# Altium PCB Orion-Bridge-R4.PcbDoc (part 2 of 2)
Units mil, origin at the board's own origin, x right, y up, seen from the top; angles counter-clockwise.
Board outline 1889.76 x 1259.84 mil, 2 copper layers (Top Layer, Bottom Layer), stack 62.992 mil thick; 52 components, 35 nets, 164 pads, 41 vias.
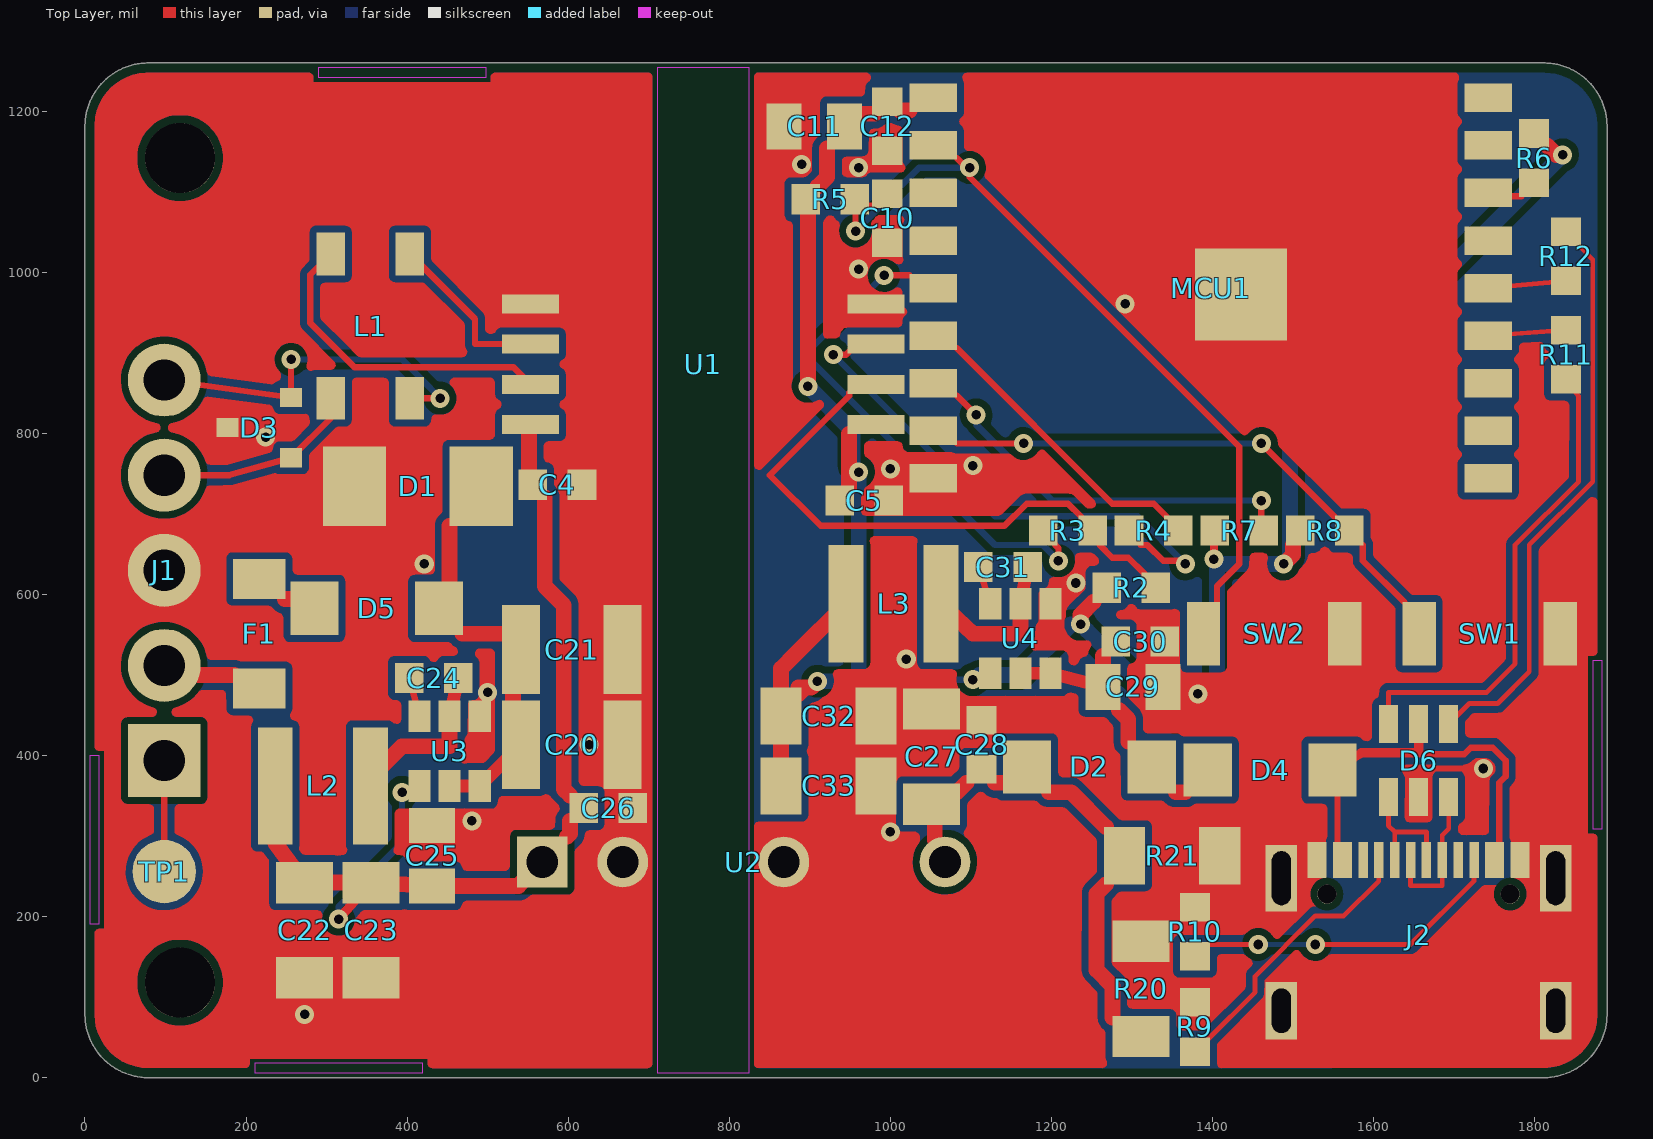
[diagram p0: Top Layer view]

## Via types
v1: diameter 23.62, hole 11.81, Top Layer to Bottom Layer, tented both sides, 41 vias

## Nets (pads, with @x,y where several pads share a name; then routed paths per layer and width w, separated by ;. In a path a pad name is that pad's centre, name@x,y a point inside that pad or via, vN(x,y) a via of type N, cw(c..) or ccw(c..) an arc to the next point about the centre after c; other vN are vias at no path point) (continued)
USB_DP: (continued)
  Top Layer w5.91: D6.4 1718.7,464.57 1753.94,464.57 1793.31,503.94 1793.31,661.42 1872.05,740.16 1872.05,1015.75 R12.1
USB_DP_IN: D6.3 J2.A6 J2.B6 | length 184.8
  Top Layer w5.91: J2.A6 1645.87,238.19 1685.24,238.19 J2.B6 1685.24,301.18 1693.11,309.06 D6.3
USB_DP_MCU: MCU1.14 R12.2 | length 96.9
  Top Layer w5.91: MCU1.14 R12.2
USB_VBUS: D4.2 D6.5 J2.A4_B9 J2.B4_A9 | length 429.3
  Top Layer w7.87: J2.A4_B9@1555.12,291.34 D4.2@1555.12,350.39 ; 1657.48,401.57 1712.6,401.57 1720.47,409.45 1748.03,409.45 1763.78,393.7 1763.78,374.02 1755.91,366.14 J2.B4_A9@1755.91,291.34
  Top Layer w11.81: D4.2 1584.65,403.15 1655.71,403.15 D6.5
pads on no net: J2. J2.A8 J2.B8 MCU1.3 MCU1.4 MCU1.10 MCU1.11 MCU1.12 MCU1.15 MCU1.17 MCU1.18

## Keep-outs
Keep-Out Layer:
  region: 710.63,5.91 824.8,5.91 824.8,1253.94 710.63,1253.94
  region: 5.91,190.94 17.72,190.94 17.72,399.61 5.91,399.61
  region: 210.63,5.91 419.29,5.91 419.29,17.72 210.63,17.72
  region: 289.37,1242.13 498.03,1242.13 498.03,1253.94 289.37,1253.94
  region: 1872.05,309.06 1883.86,309.06 1883.86,517.72 1872.05,517.72

## Other copper
Top Layer:
  drawing of 35 lines, arcs and shapes, not listed
Bottom Layer:
  drawing of 61 lines, arcs and shapes, not listed

## Silkscreen, mask and mechanical layers (free items; w line width, h text height)
Bottom Overlay:
  lines w5.91: 181.1,413.39 200.79,413.39 200.79,393.7 181.1,393.7 181.1,374.02 200.79,374.02 ; 188.98,511.81 208.66,511.81 ; 188.98,629.92 208.66,629.92 ; 188.98,728.35 188.98,767.72 ; 188.98,748.03 208.66,748.03 ; 188.98,846.46 208.66,846.46 208.66,885.83 ; 198.82,492.13 198.82,531.5 ; 208.66,728.35 208.66,767.72 ; 240.16,374.02 259.84,374.02 ; 250,374.02 250,413.39 259.84,403.54 ; 1417.32,661.42 1437.01,661.42 ; 1427.17,622.05 1427.17,661.42 ; 1446.85,622.05 1466.54,622.05 1466.54,661.42 1446.85,661.42 ; 1456.69,641.73 1466.54,641.73 ; 1476.38,661.42 1496.06,661.42 1496.06,641.73 1476.38,641.73 1476.38,622.05 1496.06,622.05 ; 1505.91,622.05 1525.59,622.05 1525.59,661.42 1505.91,661.42 ; 1515.75,641.73 1525.59,641.73 ; 1535.43,622.05 1545.28,641.73 ; 1555.12,622.05 1555.12,661.42 1535.43,661.42 1535.43,641.73 1555.12,641.73 ; 1702.76,661.42 1722.44,661.42 ; 1712.6,622.05 1712.6,661.42 ; 1811.02,641.73 1801.18,641.73 ; 1801.18,641.73 1791.34,651.57 1801.18,661.42 1811.02,661.42 1811.02,622.05 1801.18,622.05 1791.34,631.89 1801.18,641.73 ; 1732.28,622.05 1732.28,661.42 1751.97,661.42 1751.97,622.05 1732.28,622.05 ; 1761.81,622.05 1761.81,661.42 1781.5,661.42 1781.5,622.05 1761.81,622.05
Board outline:
  drawing of 260 lines, arcs and shapes, not listed
Isolation and RF planning:
  lines w3.94: 0,185.04 23.62,185.04 23.62,405.51 0,405.51 0,185.04 ; 204.72,0 425.2,0 425.2,23.62 204.72,23.62 204.72,0 ; 283.46,1236.22 503.94,1236.22 503.94,1259.84 283.46,1259.84 283.46,1236.22 ; 704.72,0 830.71,0 830.71,1259.84 704.72,1259.84 704.72,0 ; 1866.14,303.15 1889.76,303.15 1889.76,523.62 1866.14,523.62 1866.14,303.15